# Altium PCB EVB-2.PCBDOC (part 4 of 6)
Units mil, origin at the board's own origin, x right, y up, seen from the top; angles counter-clockwise.
Board outline 2401.57 x 1771.65 mil, 6 copper layers (Top, Mid1-H, Mid2-PWR, GND, Mid3-V, Bottom), stack 59.449 mil thick; 172 components, 166 nets, 823 pads, 550 vias.
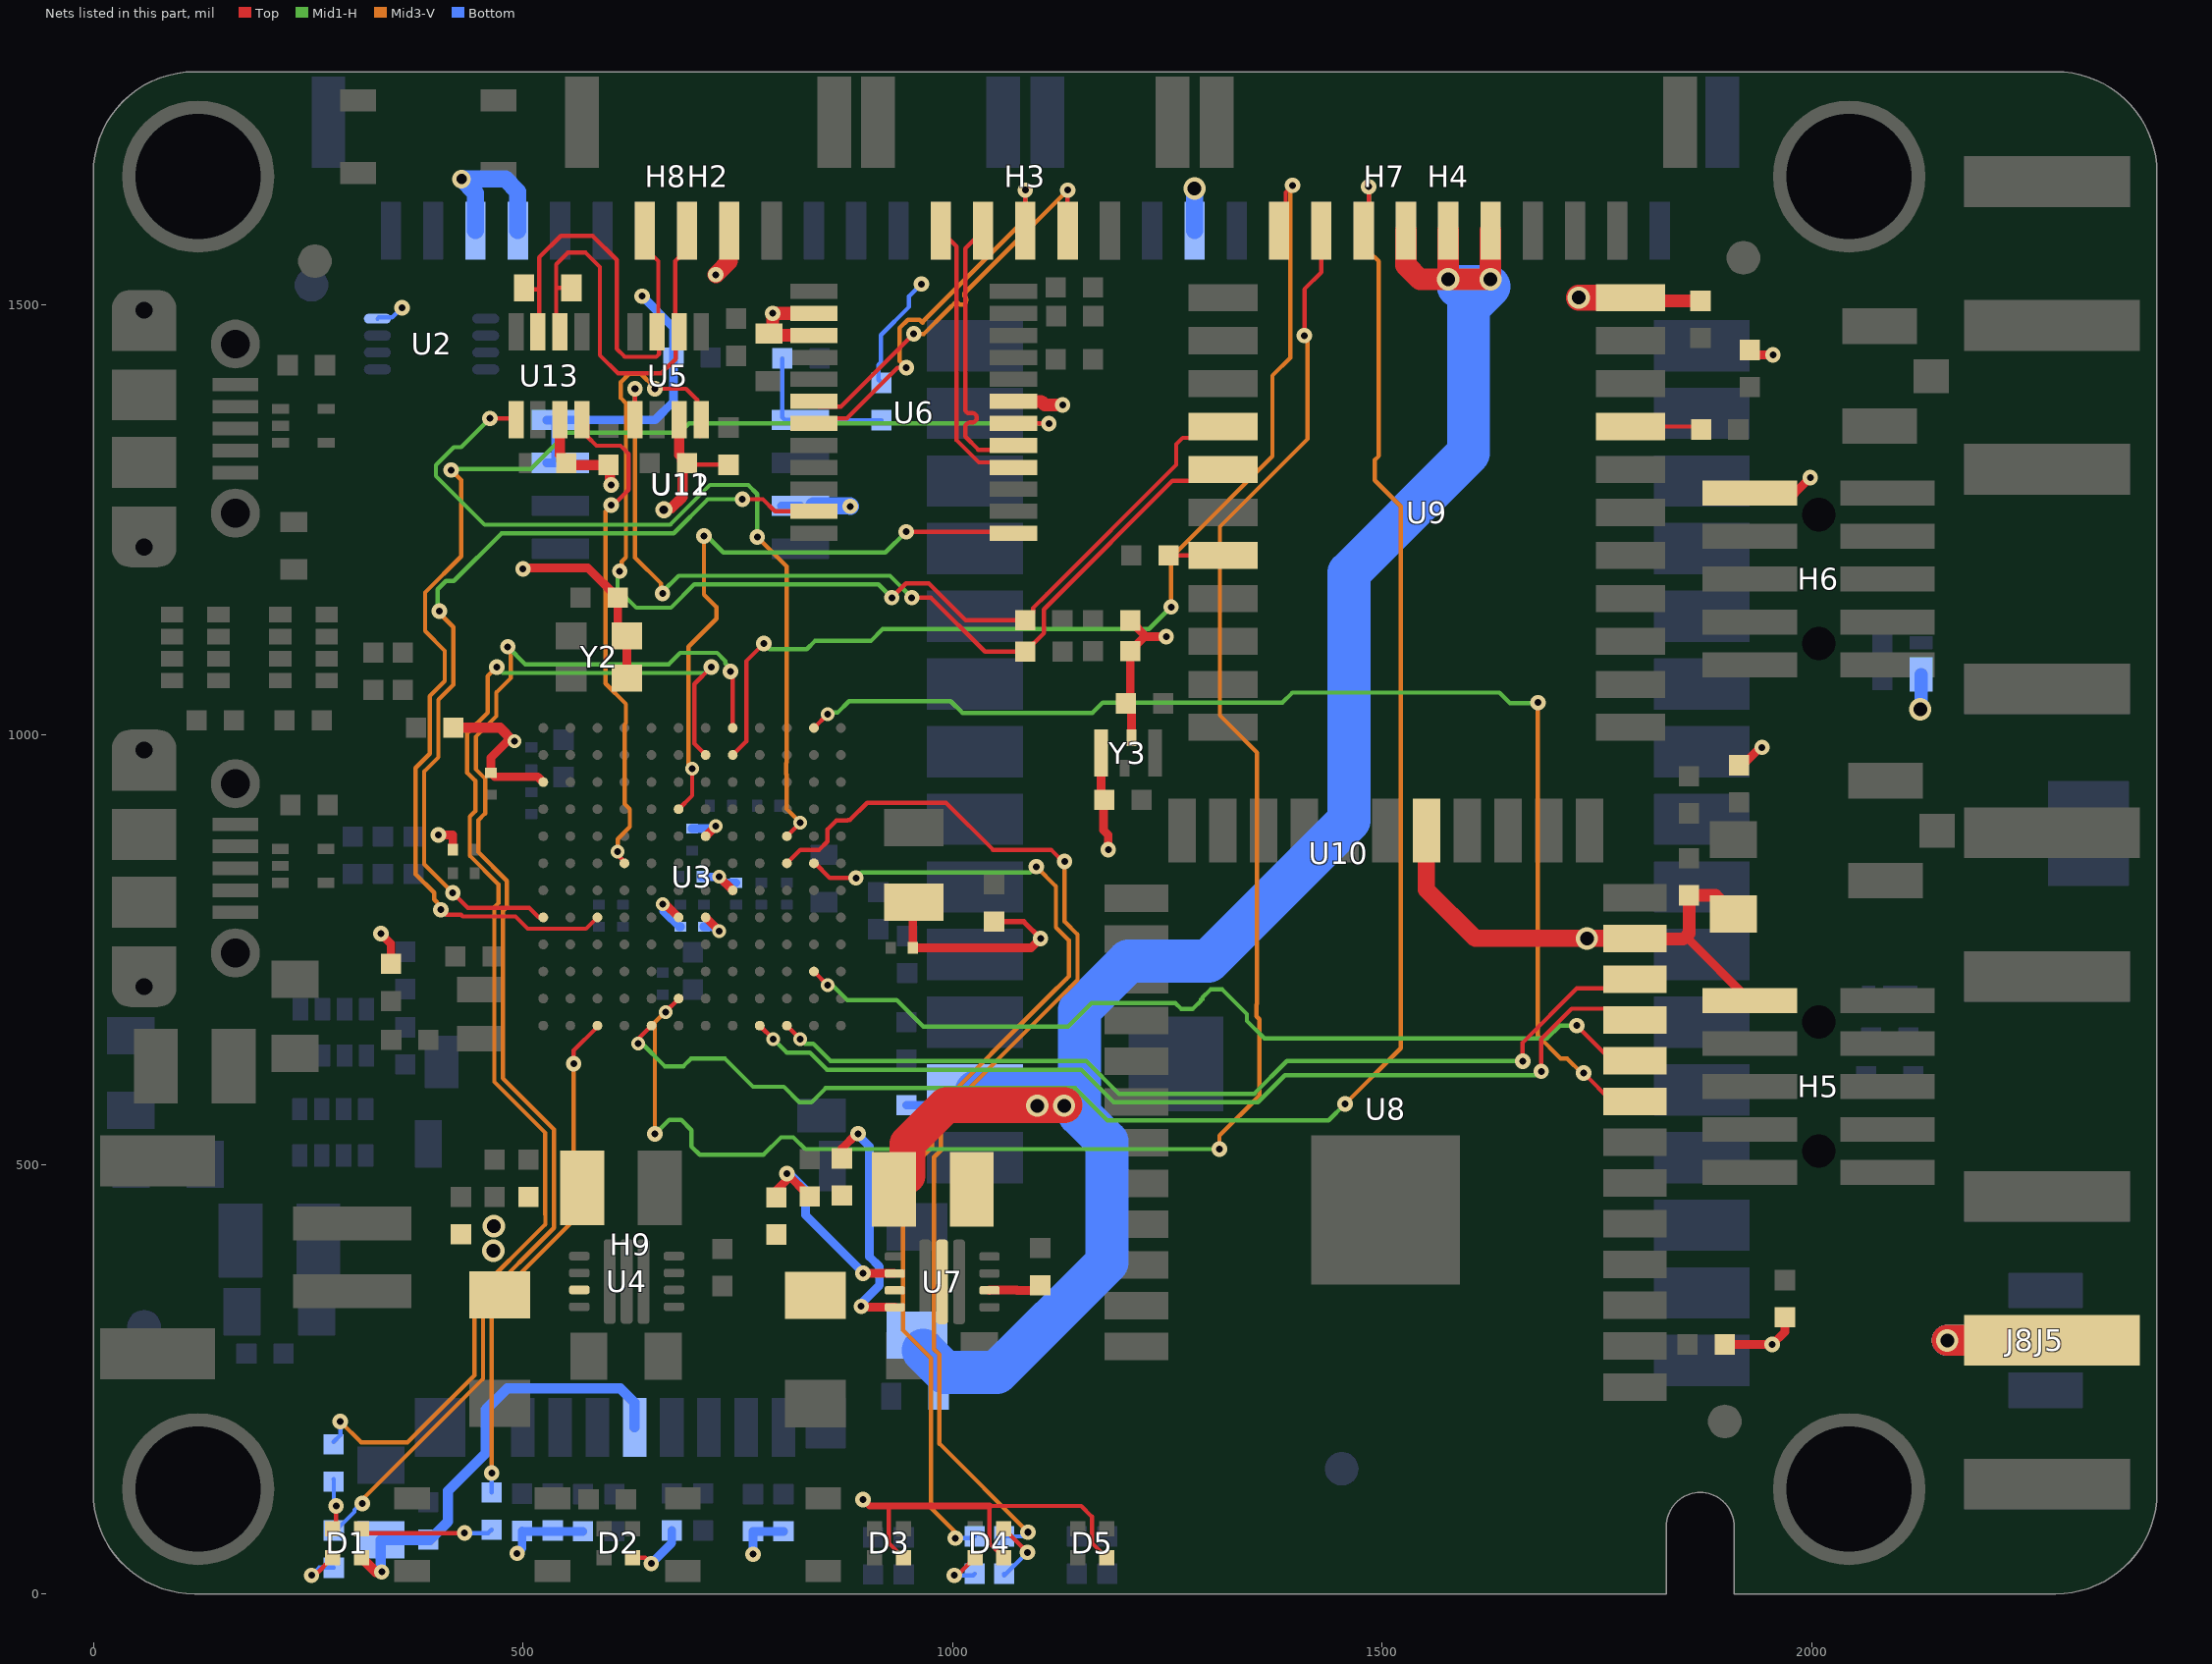
[diagram p6: the nets of this part, all layers, seen from the top]

## Via types
v1: diameter 18, hole 8, Top to Bottom, 385 vias
v2: diameter 16, hole 8, Top to Bottom, 100 vias
v3: diameter 26, hole 16, Top to Bottom, 58 vias
v4: diameter 22, hole 12, Top to Bottom, 3 vias
v5: diameter 20, hole 10, Top to Bottom, 2 vias
v6: diameter 18, hole 8.27, Top to Bottom, 2 vias

## Nets (pads, with @x,y where several pads share a name; then routed paths per layer and width w, separated by ;. In a path a pad name is that pad's centre, name@x,y a point inside that pad or via, vN(x,y) a via of type N, cw(c..) or ccw(c..) an arc to the next point about the centre after c; other vN are vias at no path point) (continued)
BEE.FB: (continued)
  Top w10: R12.1@794.9,461.61 794.9,470.14 795.27,470.14 807.13,482 v1(807.13,489.14) R13.2@832.68,463.58 ; v1(895.85,373.11) U7.5@931.89,373.11
  Bottom w10: v1(807.13,489.14) 810.43,489.14 828.9,470.67 828.9,440.78 v1@895.66,374.02
Bee.Grn: D4.4 R30.1 | length 79.2
  Top w5: D4.4@1059.66,75.79 v1(1087.05,48.4)
  Bottom w5: R30.1@1060.04,23.62 1060.04,21.39 v1(1087.05,48.4)
BEE.PG: R14.1 U7.7 | length 291.2
  Top w10: R14.1@871.07,506.89 871.07,518.28 888.52,535.72 v1(890.05,535.72) ; 903.16,333.66 U7.7@932.69,333.66
  Bottom w10: v1(890.05,535.72) 890.05,533.86 903.14,520.77 903.14,392.68 914.85,380.98 914.85,359.23 893.27,337.65 896.27,334.64 v1(893.7,334.64)
Bee.Red: D4.2 R31.1 | length 57.5
  Top w5: v1(1001.97,21.65) 1005.53,21.65 D4.2@1026.2,42.32
  Bottom w5: v1(1001.97,21.65) 1023.85,21.65 R31.1@1025.82,23.62
BEE.SS/TR: C21.1 U7.9 | length 61.7
  Top w5: C21.1@1096.08,353.35 C21.1@1101.98,359.25
  Top w10: U7.9@1042.93,353.35 1043.23,353.64 1074.8,353.64 1075.1,353.35 C21.1@1096.08,353.35
BEE.SW: I4.1 U7.2
BEE_ANT: J5.1 J8.1 | length 176.7
  Top w36: v3(2157.48,295) 2279.25,295 J5.1@2279.53,295.28
  Bottom w36: v3(2157.48,295) J8.1@2212.01,295
BTLE-Ser.CTS: U3.M10 U8.11 | length 1087.6
  Top w5: U3.M10@807.09,661.42 v2(822.62,645.88) ; v1(1663.38,620.08) 1663.38,641.73 1726.38,704.72 1783.24,704.72 U8.11@1793.94,715.42
  Mid1-H w5: v2(822.62,645.88) 828.33,640.17 837.91,640.17 857.91,620.17 1155.55,620.17 1193.49,582.22 1351.16,582.22 1389.11,620.17 1649.72,620.17 1649.81,620.08 v1(1663.38,620.08)
BTLE-Ser.RTS: U3.M9 U8.10 | length 1128
  Top w5: U3.M9@775.59,661.42 v2@791.34,645.67 ; v1(1685.04,608.27) 1685.04,645.67 1720.47,681.1 1780.85,681.1 U8.10@1793.94,668.02
  Mid1-H w5: v2(791.12,645.88) 806.83,630.17 833.77,630.17 853.77,610.17 1149.57,610.17 1187.52,572.22 1355.3,572.22 1386.66,603.58 1680.35,603.58 v1(1685.04,608.27)
BTLE-Ser.RxD: U3.K11 U8.9 | length 1058.3
  Top w5: U3.K11@838.58,724.41 v2(854.33,708.66) ; v1(1726.37,661.42) 1767.17,620.61 U8.9@1793.94,620.61
  Mid1-H w5: v2(854.33,708.66) 860.05,708.66 877.48,691.23 935.02,691.23 965.96,660.29 1134.43,660.29 1161.64,687.49 1259.36,687.49 1265.86,680.99 1279.53,680.99 1289.19,690.66 1289.19,692.05 1290.58,692.05 1290.58,693.84 1300.25,703.51 1313.92,703.51 1342.52,674.9 1342.52,666.82 1362.61,646.73 1692,646.73 1706.69,661.42 v1(1726.37,661.42)
BTLE-Ser.TxD: U3.A11 U8.8 | length 1408.5
  Top w5: U3.A11@838.58,1007.87 v2(854.33,1023.62) ; v1(1734.25,606.3) 1767.33,573.21 U8.8@1793.94,573.21
  Mid1-H w5: v2(854.33,1023.62) 856.44,1025.73 866.01,1025.73 879.41,1039.12 997.75,1039.12 1011.37,1025.51 1162.85,1025.51 1174.87,1037.53 1383.98,1037.53 1395.51,1049.06 1636.27,1049.06 1648.68,1036.65 1680.35,1036.65 v1(1681.1,1037.4)
  Mid3-V w5: v1(1681.1,1037.4) 1681.1,649.68 1707.52,623.26 1715.02,623.26 1731.99,606.3 v1(1734.25,606.3)
CAN-EVB.RxD: U3.F4 U13.4 | length 596.2
  Top w5: U13.4@568.68,1366.6 575.04,1360.25 575.04,1346.92 585.57,1336.38 613.46,1336.38 623.09,1326.75 623.09,1285.16 605.29,1267.35 v1(602.55,1267.35) ; v2(610.23,864.17) 612.34,862.07 612.34,857.9 618.11,852.13 U3.F4@618.11,850.39
  Mid3-V w5: v1@602.55,1271.65 v1(602.55,1267.35) 602.55,1266.34 596.05,1259.84 596.05,1059.54 619.83,1035.77 619.83,1013.26 618.36,1011.79 618.36,919.31 624.39,913.28 624.39,911.93 624.39,892.71 610.23,878.55 v2@610.23,862.2
CAN-EVB.TxD: U3.E10 U13.1 | length 975.9
  Top w5: v1(461.61,1368.11) 490.4,1368.11 U13.1@491.91,1366.6 ; U3.E10@807.09,881.89 v2(822.83,897.64)
  Mid1-H w5: v1(461.61,1368.11) 428.14,1334.65 419.68,1334.65 398.71,1313.68 398.71,1301.07 455.37,1244.41 671.3,1244.41 717.58,1290.69 762.17,1290.69 772.64,1280.22 v1(772.64,1230.1)
  Mid3-V w5: v1(772.64,1230.1) 806.84,1195.9 806.84,967.55 806.39,967.1 806.39,954.26 806.84,953.81 806.84,913.63 v2(822.83,897.64)
CAN-uINS.RxD: R17.1 U5.4 U9.4 | length 1257.9
  Top w5: v6(653.58,1402.63) 689.89,1402.63 702.76,1389.76 702.76,1350.45 U5.4@705.71,1347.5 ; v1(929.18,1159.51) 945.68,1176.01 972.33,1176.01 1015.16,1133.17 R17.1@1084.43,1133.17 1093.5,1142.25 1093.5,1147.31 1109.58,1163.39 1260.27,1314.06 1260.27,1338.02 1267.72,1345.47 1296.5,1345.47 U9.4@1309.68,1358.66
  Mid1-H w5: v1(612.55,1190.35) 610.07,1187.86 610.07,1169.75 631.89,1147.93 672.25,1147.93 699.29,1174.96 913.72,1174.96 v1(929.18,1159.51)
  Mid3-V w5: v1(612.55,1190.35) 615.04,1192.84 615.04,1201.5 619.85,1206.3 619.85,1385.84 613.95,1391.74 613.95,1410.38 623.61,1420.04 637.28,1420.04 653.58,1403.75 v6(653.58,1402.63)
CAN-uINS.TxD: R18.1 U5.1 U9.5 | length 1086.8
  Top w5: U5.1@630.45,1366.6 v6@630.45,1403.54 ; v1(952.55,1159.51) 974.69,1159.51 1037.58,1096.61 R18.1@1084.65,1096.61 1106.3,1118.26 1106.3,1145.96 1113.72,1153.39 ; 1113.74,1153.39 1255.77,1295.41 1296.44,1295.41 U9.5@1309.68,1308.66
  Mid1-H w5: v1(662.43,1164.43) 662.43,1166.31 681.09,1184.96 927.09,1184.96 v1(952.55,1159.51)
  Mid3-V w5: v6@630.45,1403.54 630.45,1206.17 660.8,1175.82 660.8,1166.07 v1(662.43,1164.43)
  other v6: 630.45,1402.63
CAN.D_N: H2.3 R11.2 U5.6 U13.6 | length 527.9
  Top w5: U13.6@538.63,1490.16 538.63,1547.48 552.17,1561.03 572.91,1561.03 589.55,1544.39 589.55,1441.6 610.63,1420.53 661.06,1420.53 677.68,1437.14 677.68,1465.02 U5.6@681.63,1468.97 677.17,1473.43 677.17,1551.18 690.94,1564.96 H2.3@690.94,1586.61 ; 539.95,1520.06 R11.2@556.34,1520.06 R11.2@560.28,1520.06 ; H2.3@687.01,1564.96 H2.3@687.01,1586.61
CAN.D_P: H2.4 R11.1 U5.7 U13.7 | length 527.3
  Top w5: R11.1@498.62,1518.47 518.94,1518.47 ; U13.7@518.94,1470.41 518.94,1555.64 544.02,1580.71 581.06,1580.71 609.24,1552.54 609.24,1449.06 618.58,1439.72 655.13,1439.72 658.15,1442.74 658.15,1466.86 U5.7@656.04,1468.97 657.48,1470.41 657.48,1551.18 H2.4@641.73,1566.93 ; H2.4@637.8,1566.93 H2.4@637.8,1586.61
Cblu: D1.3 R56.1 | length 58.6
  Top w5: D1.3@278.54,75.79 282.48,79.72 v1(282.48,102.36)
  Bottom w5: R56.1@279.69,133.69 279.82,133.57 v1@279.82,103.35
CFG.blu: R56.2 U3.B7 | length 1516.7
  Top w5: U3.B7@712.6,976.38 699.39,989.59 699.39,1059.01 v1(719.11,1078.73)
  Mid1-H w5: v1(469.51,1078.79) 476.38,1071.92 712.3,1071.92 v1(719.11,1078.73)
  Mid3-V w5: v1(287.4,200.79) 311.78,176.41 365.55,176.41 443.58,254.44 443.58,347.66 526.13,430.21 526.13,441.68 526.02,441.78 526.02,536.61 466.63,596 466.63,799.24 471.38,803.98 471.38,825.94 438.07,859.25 438.07,904.68 444.61,911.22 444.61,946.31 435.12,955.81 435.12,1001.81 459.03,1025.72 459.03,1068.31 v1(469.51,1078.79)
  Bottom w5: R56.2@279.69,177 287.4,184.71 v1(287.4,200.79)
CFG.grn: R46.2 U3.M3 | length 594.3
  Top w5: v1(559.06,617.13) 559.06,632.53 586.61,660.09 U3.M3@586.61,661.42
  Mid3-V w5: v1(463.58,140.75) 463.58,339.38 559.06,434.85 v1(559.06,617.13)
  Bottom w5: R46.2@463.58,118.11 v1(463.58,140.75)
CFG.red: R55.2 U3.A8 | length 1556.2
  Top w5: v1(741.53,1073.62) 743.85,1071.3 743.85,1008.12 U3.A8@744.09,1007.87
  Mid1-H w5: v1(482.28,1102.36) 502.72,1081.92 669.65,1081.92 682.95,1095.23 725.94,1095.23 735.61,1085.56 735.61,1083.06 741.53,1077.14 v1(741.53,1073.62)
  Mid3-V w5: v1(312.99,105.32) 312.99,109.71 453.58,250.3 453.58,343.52 536.13,426.06 536.13,540.65 476.63,600.14 476.63,795.09 481.38,799.84 481.38,830.08 448.07,863.39 448.07,900.53 455.94,908.41 455.94,949.13 445.12,959.95 445.12,997.67 469.03,1021.58 469.03,1049.13 486.01,1066.11 486.01,1098.63 v1(482.28,1102.36)
  Bottom w5: R55.2@279.82,73.82 282.19,73.82 303.9,95.53 303.9,97.9 311.32,105.32 v1(312.99,105.32)
Cgrn: D1.4 R46.1 | length 155.2
  Top w5: D1.4@312.01,75.79 316.93,70.87 v1(432.09,70.87)
  Bottom w5: v1(432.09,70.87) 459.65,70.87 R46.1@463.58,74.8
Cred: D1.2 R55.1 | length 62.7
  Top w5: v1(253.94,21.65) 257.87,21.65 D1.2@278.54,42.32
  Bottom w5: v1(253.94,21.65) 262.8,30.51 R55.1@279.82,30.51
Ext-Radio-RST: H4.9 U3.B8 | length 1250.1
  Top w5: U3.B8@744.09,976.38 759.84,992.13 759.84,1085.63 v1(780.32,1106.1) ; H4.9@1379.92,1586.61 1387.57,1594.26 1387.57,1631.22 v1(1395.67,1639.32)
  Mid1-H w5: v1(780.32,1106.1) 786.71,1099.71 830.33,1099.71 839.74,1109.12 904.82,1109.12 918.64,1122.95 1228.54,1122.95 v1(1254.21,1148.62)
  Mid3-V w5: v1(1254.21,1148.62) 1254.21,1206.07 1372.22,1324.08 1372.22,1417.94 1392.95,1438.67 1392.95,1636.6 v1(1395.67,1639.32)
Ext-Radio.RxD: H4.7 U3.M5 | length 2140.3
  Top w5: v2(633.89,640.78) 633.89,645.7 U3.M5@649.61,661.42 ; H4.7@1478.35,1586.61 1478.35,1562.99 1480.31,1561.03 H4.7@1484.25,1564.97 ; H4.7@1480.31,1594.21 H4.7@1484.25,1598.14 ; H4.7@1484.25,1564.98 H4.7@1484.25,1598.14 ; v1(1484.25,1637.79) H4.7@1484.25,1598.15
  Mid1-H w5: v2(633.89,640.78) 638.33,640.78 664.93,614.17 686.74,614.17 695.56,622.99 735.16,622.99 767.82,590.34 803.65,590.34 821.87,572.11 835.62,572.11 852.2,588.7 1142.75,588.7 1180.27,551.18 1437.7,551.18 v1(1456.69,570.17)
  Mid3-V w5: v1(1456.69,570.17) 1521.65,635.13 1521.65,1265.75 1491.37,1296.03 1491.37,1319.83 1496.06,1324.52 1496.06,1550.89 1484.25,1562.71 v1(1484.25,1637.79)
Ext-Radio.TxD: H4.8 U3.L6 | length 2035.4
  Top w5: v2(665.87,676.96) 665.87,677.32 681.1,692.55 U3.L6@681.1,692.91 ; v1(1409.45,1464.57) 1409.45,1518.47 1429.13,1538.15 H4.8@1429.13,1586.61
  Mid1-H w5: v1(653.54,535.43) 653.83,535.43 670.33,551.93 684,551.93 696.1,539.83 696.1,520.72 705.76,511.06 779.85,511.06 800.29,531.5 814.67,531.5 828.47,517.7 v1(1310.53,517.7)
  Mid3-V w5: v1(653.54,535.43) 653.54,665.35 665.14,676.96 v2(665.87,676.96) ; v1(1310.53,517.7) 1310.53,533.33 1357.05,579.84 1357.05,668.83 1353.58,672.3 1353.58,685.97 1354.33,686.72 1354.33,979.16 1311.02,1022.46 1311.02,1242.13 1413.22,1344.32 1413.22,1460.8 v1(1409.45,1464.57)
FLASH.CS: R35.1 R37.1 U11.1 U12.1 | length 185.5
  Bottom w5: R37.1@801.69,1437.99 801.69,1369.57 804.92,1366.34 U11.1@822.83,1366.34 838.39,1366.34 U12.1@838.58,1366.14 R35.1@917.32,1366.14
G3/Tx0: R24.1 U9.19 | length 78.5
  Top w5: U9.19@1793.94,1358.66 1867.72,1358.66 R24.1@1871.06,1355.31
G7/Tx1: R21.1 U9.7 | length 58.3
  Top w5: R21.1@1251.34,1208.66 U9.7@1309.68,1208.66